# Altium PCB Thunderscope_Rev5.3.PcbDoc (part 10 of 14)
Units mil, origin at the board's own origin, x right, y up, seen from the top; angles counter-clockwise.
Board outline 3937.01 x 3838.58 mil, 6 copper layers (F.Cu, In1.Cu (GND), In2.Cu (Sign), In3.Cu (Sign), In4.Cu (GND), B.Cu), stack 60.556 mil thick; 911 components, 486 nets, 2834 pads, 2761 vias.
Unrouted connection lines stored in the file: 618.
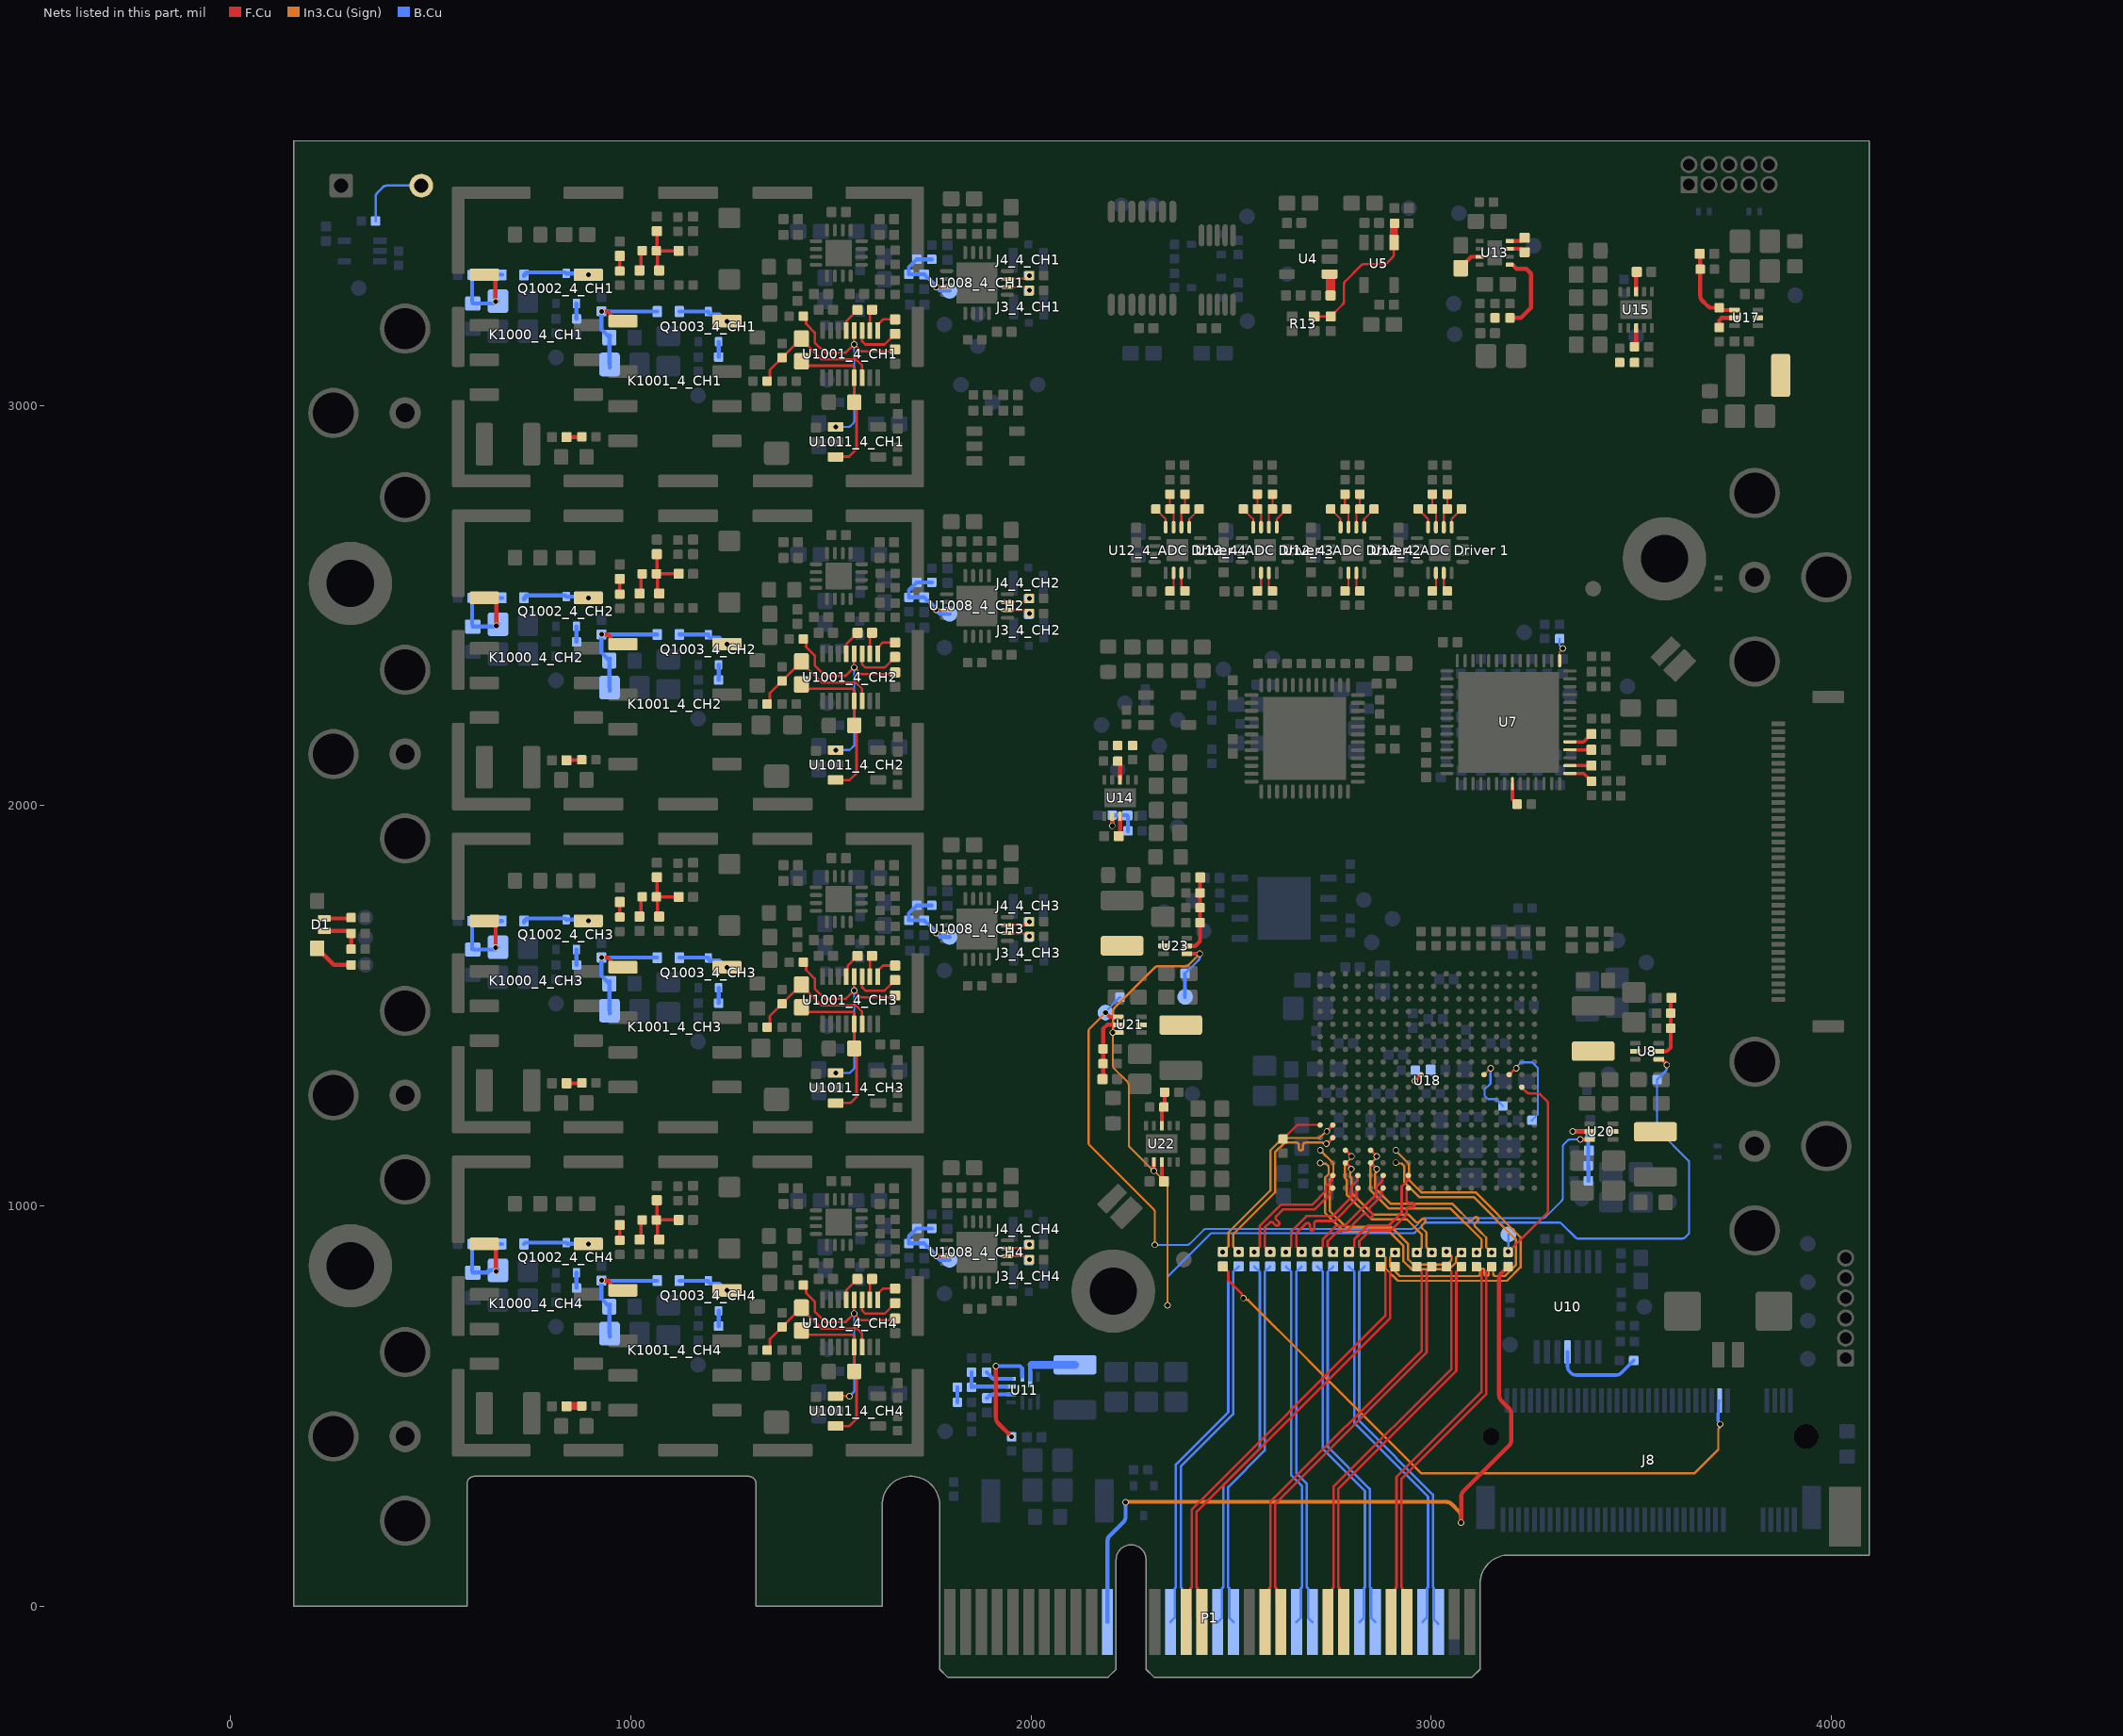
[diagram p13: the nets of this part, all layers, seen from the top]

## Via types
v1: diameter 16, hole 11.81, F.Cu to B.Cu, tented both sides, 2761 vias

## Nets (pads, with @x,y where several pads share a name; then routed paths per layer and width w, separated by ;. In a path a pad name is that pad's centre, name@x,y a point inside that pad or via, vN(x,y) a via of type N, cw(c..) or ccw(c..) an arc to the next point about the centre after c; other vN are vias at no path point) (continued)
M2_REFCLK_P: C47.1 J8.56 | length 1600.6
  F.Cu w6.2: C47.1@2479.33,849.02 2492.92,835.4 2492.92,814.4 2526.06,781.26 2526.06,777.69 2530.96,772.79 v1(2530.96,770.13)
  In3.Cu (Sign) w5.7: 2538.82,765.06 2542.61,765.06 2694.06,613.61 2694.06,612.99 2974.36,332.69 3658.02,332.69 3717.27,391.95 3717.27,442.9 3719.95,445.58 3719.95,452.75 v1(3721.92,454.72)
  B.Cu w7.51: 3716.89,462.05 3716.89,482.63 3718.23,483.98 3718.23,511.54 J8.56@3720.47,513.78
MGT_CLK1_N: C44.2 C46.2 U18.B5 | length 487.2
  F.Cu w7.51: v1@2739.43,1155.38 U18.B5@2753.99,1169.94
  In3.Cu (Sign) w5.7: v1(2518.7,885.24) 2504.87,899.07 2504.87,928.99 2609.85,1033.98 2609.85,1134.24 2633.8,1158.19 2650,1158.19 2663.55,1158.19 cw(c2663.55,1152.49) 2669.25,1152.49 2669.25,1144.34 ccw(c2674.6,1144.34) 2679.95,1144.34 2679.95,1152.49 cw(c2685.65,1152.49) 2685.65,1158.19 2710.47,1158.19 2728.15,1158.19 2728.99,1157.35 2736.27,1157.35 v1(2738.24,1155.38)
MGT_CLK1_P: C45.2 C47.2 U18.B6 | length 494.2
  F.Cu w7.51: v1(2739.43,1186.87) U18.B6@2753.99,1201.44
  In3.Cu (Sign) w5.7: v1(2479.33,885.24) 2493.17,899.07 2493.17,933.84 2598.15,1038.83 2598.15,1139.08 2628.96,1169.89 2720.51,1169.89 2737.5,1186.87 v1(2739.43,1186.87)
  B.Cu w7.51: v1(2479.33,885.24) C45.2@2486.05,891.95
MGT_RX0_N: R25.1 R27.1 U18.E3 | length 473.4
  F.Cu w7.51: U18.E3@2849.17,1107.64 2863.84,1092.97 v1(2863.84,1092.38)
  In3.Cu (Sign) w5.7: v1(2863.84,1092.38) 2861.86,1090.41 2861.86,1083.13 2859.29,1080.56 2859.29,1044.94 2898.97,1005.26 3053.14,1005.26 3073.17,985.23 3075.19,983.21 3093.99,964.41 ccw(c3098.02,968.44) 3102.05,964.41 3108.45,970.81 cw(c3112.23,967.02) 3116.02,970.81 cw(c3112.23,967.02) 3116.02,963.24 3109.62,956.84 ccw(c3113.65,952.81) 3109.62,948.78 3117.19,941.22 3119.2,939.2 3137.56,920.84 3137.56,896.88 v1(3150.59,883.86)
MGT_RX0_P: R26.1 R28.1 U18.E4 | length 479
  F.Cu w7.51: U18.E4@2849.17,1139.14 2863.74,1124.57 v1(2863.74,1123.88)
  In3.Cu (Sign) w5.7: v1(2863.74,1123.88) 2863.74,1121.09 2847.59,1104.95 2847.59,1040.09 2894.13,993.56 3048.3,993.56 3125.86,915.99 3125.86,896.88 v1(3112.84,883.86)
MGT_RX1_N: R29.1 R31.1 U18.A3 | length 590.3
  In3.Cu (Sign) w5.7: v1(2722.44,1107.78) 2724.41,1105.8 2736.77,1105.8 2743.66,1098.92 2743.66,1079.78 2734.75,1070.87 2734.75,982.79 2781.13,936.41 2894.15,936.41 2930.69,899.88 2930.69,861.99 2950.47,842.2 3045.08,842.2 3062.59,859.71 3062.59,872.03 3074.41,883.86 v1(3075.44,883.86)
MGT_RX1_P: R30.1 R32.1 U18.A4 | length 582.8
  F.Cu w7.51: U18.A4@2722.44,1139.27 v1(2722.83,1139.27)
  In3.Cu (Sign) w5.7: v1(2722.83,1139.27) 2755.36,1106.74 2755.36,1074.94 2746.45,1066.03 2746.45,987.64 2785.98,948.11 2899,948.11 2942.39,904.72 2942.39,866.84 2955.32,853.9 3040.23,853.9 3050.89,864.55 3050.89,874 3039.06,885.83 v1(3038.04,885.83)
MGT_RX2_N: R33.1 R35.1 U18.C3 | length 398.9
  F.Cu w7.51: U18.C3@2785.49,1108.33 v1@2800.35,1093.47
  In3.Cu (Sign) w5.7: v1(2800.06,1092.68) 2798.09,1090.71 2798.09,1083.43 2797.28,1082.62 2797.28,1073.18 2800.39,1070.07 2800.39,1033.67 2855.74,978.33 2943.51,978.33 2953.48,968.36 2955.5,966.34 2961.68,960.16 ccw(c2965.71,964.19) 2969.74,960.16 2976.65,967.06 cw(c2980.43,963.28) 2984.21,967.06 cw(c2980.43,963.28) 2984.21,959.5 2977.31,952.59 ccw(c2981.34,948.56) 2977.31,944.53 2988.13,933.7 2988.13,928.13 2988.13,896.71 v1(3000.98,883.86)
MGT_RX2_P: R34.1 R36.1 U18.C4 | length 404.5
  F.Cu w7.51: U18.C4@2786.18,1139.14 2800.74,1124.57 v1(2800.74,1123.88)
  In3.Cu (Sign) w5.7: v1(2800.74,1123.88) 2800.74,1121.09 2784.21,1104.55 2784.21,1069.71 2788.69,1065.23 2788.69,1028.83 2850.89,966.63 2938.66,966.63 2976.43,928.86 2976.43,896.71 v1(2963.58,883.86)
MGT_RX3_N: R37.1 R39.1 U18.G3 | length 905.4
  In3.Cu (Sign) w5.7: v1(2909.78,883.86) 2897.26,871.33 2897.26,849.05 2921.37,824.93 3054.82,824.93 3116.78,824.93 ccw(c3116.78,830.63) 3122.48,830.63 3122.48,838.06 cw(c3127.83,838.06) 3133.18,838.06 3133.18,830.28 ccw(c3138.53,830.28) 3143.88,830.28 3143.88,841.58 cw(c3149.23,841.58) 3154.58,841.58 3154.58,830.63 ccw(c3160.28,830.63) 3160.28,824.93 3173.84,824.93 3184.37,824.93 3211.45,852.01 3211.45,917.03 3106.06,1022.42 2970.04,1022.42 2932.98,1059.49 2932.98,1099.55 2926.3,1106.22 2913.26,1106.22 v1(2911.42,1108.07)
MGT_RX3_P: R38.1 R40.1 U18.G4 | length 911
  F.Cu w7.51: v1(2911.42,1139.27) 2911.55,1139.14 U18.G4@2912.16,1139.14
  In3.Cu (Sign) w5.7: v1(2873.03,883.86) 2885.56,871.33 2885.56,844.2 2916.53,813.23 3189.22,813.23 3223.15,847.16 3223.15,921.88 3110.9,1034.12 2974.89,1034.12 2944.68,1064.34 2944.68,1104.39 2911.42,1137.65 v1(2911.42,1139.27)
MGT_TX0_N: C28.2 C30.2 U18.H1 | length 276.5
  F.Cu w6.2: C30.2@2833.66,885.26 2820.08,898.85 2820.08,912.27 2846.84,939.03 2898.81,939.03 2929.78,970 2938.33,978.55 2938.33,990.5 cw(c2944.53,990.5) 2944.53,996.7 2952.77,996.7 ccw(c2952.77,1002.3) 2952.77,1007.9 2944.53,1007.9 cw(c2944.53,1014.1) 2938.33,1014.1 2938.33,1024.87 2938.33,1038.15 2942.91,1042.73 U18.H1@2942.91,1044.78
  other v1: 2833.66,885.24
MGT_TX0_P: C29.2 C31.2 U18.H2 | length 283.1
  F.Cu w6.2: C31.2@2794.29,885.26 2807.88,898.85 2807.88,917.32 2841.78,951.23 2893.76,951.23 2926.13,983.61 2926.13,1048.81 2941.46,1064.14 2941.46,1074.83 U18.H2@2942.91,1076.28
  other v1: 2794.29,885.24
MGT_TX1_N: C32.2 C34.2 U18.F1 | length 265.3
  F.Cu w6.2: C34.2@2754.92,885.26 2741.34,898.85 2741.34,912.27 2767.52,938.46 2789.26,938.46 2819.52,968.71 2829.63,978.83 cw(c2834.02,974.44) 2838.4,978.83 2844.23,973 ccw(c2848.19,976.96) 2852.15,973 ccw(c2848.19,976.96) 2852.15,980.92 2846.32,986.74 cw(c2850.7,991.13) 2846.32,995.51 2858.21,1007.4 2875.34,1024.53 2875.34,1038.15 2879.92,1042.73 U18.F1@2879.92,1044.78
  other v1: 2754.92,885.24
MGT_TX1_P: C33.2 C35.2 U18.F2 | length 271.9
  F.Cu w6.2: C35.2@2715.55,885.26 2729.14,898.85 2729.14,917.32 2762.47,950.66 2784.21,950.66 2863.14,1029.59 2863.14,1048.81 2878.47,1064.14 2878.47,1074.83 U18.F2@2879.92,1076.28
  other v1: 2715.55,885.24
MGT_TX2_N: C36.2 C38.2 U18.D1 | length 297.4
  F.Cu w6.2: C38.2@2676.18,885.26 2662.6,898.85 2662.6,932.07 2679.63,949.11 2686.14,955.62 cw(c2690.53,951.24) 2696.73,951.24 2696.73,944.4 ccw(c2702.33,944.4) 2707.93,944.4 2707.93,956.47 cw(c2714.13,956.47) 2714.13,962.67 2735.08,962.67 2758.7,962.67 2812.35,1016.31 2812.35,1038.15 2816.93,1042.73 U18.D1@2816.93,1044.78
  other v1: 2676.18,885.24
MGT_TX2_P: C37.2 C39.2 U18.D2 | length 304
  F.Cu w6.2: C39.2@2636.81,885.26 2650.4,898.85 2650.4,937.13 2688.14,974.87 2753.65,974.87 2800.15,1021.37 2800.15,1048.81 2815.48,1064.14 2815.48,1074.83 U18.D2@2816.93,1076.28
  other v1: 2636.81,885.24
MGT_TX3_N: C40.2 C42.2 U18.B1 | length 311.8
  F.Cu w6.2: C42.2@2597.44,885.26 2583.86,898.85 2583.86,945.92 2586.1,948.16 2596.21,958.27 cw(c2600.59,953.88) 2604.98,958.27 2610.8,952.44 ccw(c2614.76,956.4) 2618.72,952.44 ccw(c2614.76,956.4) 2618.72,960.36 2612.9,966.19 cw(c2617.28,970.57) 2612.9,974.96 2621.91,983.97 2629.41,991.47 2708.34,991.47 2749.36,1032.49 2749.36,1038.15 2753.94,1042.73 U18.B1@2753.94,1044.78
  other v1: 2597.44,885.24
MGT_TX3_P: C41.2 C43.2 U18.B2 | length 318.4
  F.Cu w6.2: C43.2@2558.07,885.26 2571.66,898.85 2571.66,950.97 2624.36,1003.67 2703.29,1003.67 2737.16,1037.54 2737.16,1048.81 2752.49,1064.14 2752.49,1074.83 U18.B2@2753.94,1076.28
  other v1: 2558.07,885.24
NetC4_2: C4.2 R13.4 R107.2 U5.1 | length 371.6
  F.Cu w6: R13.4@2707.48,3222.64 2739.37,3222.64 C4.2@2748.82,3222.24 2778.4,3251.82 ccw(c2769.89,3260.29) 2781.89,3260.29 2781.89,3302.12 cw(c2793.89,3302.12) 2785.4,3310.6 2824.07,3349.27 cw(c2832.53,3340.76) 2832.53,3352.76 2880.86,3352.76 ccw(c2880.86,3364.76) 2889.34,3356.27 2903.26,3370.19 ccw(c2894.79,3378.69) 2906.79,3378.69 U5.1@2906.79,3407.09
  F.Cu w19.68: U5.1@2906.79,3407.09 2906.79,3452.95 R107.2@2908.37,3454.92
NetC7_1: C7.1 U4.1 | length 54.1
  F.Cu w10: U4.1@2746.06,3328.15 U4.1@2748.42,3325.79
  F.Cu w23.62: C7.1@2748.42,3275 U4.1@2748.42,3325.79
NetC13_2: C13.2 U11.8 | length 64.5
  B.Cu w10: C13.2@1889.76,520.08 1897.36,527.68 1901.74,527.68 1903.22,529.16 U11.8@1950.55,529.16
NetC64_2: C64.2 U7.15 | length 62.3
  F.Cu w8: U7.15@3346.46,2080.71 3380.91,2080.71 C64.2@3400.59,2061.02
NetC65_2: C65.2 U7.16 | length 54.1
  F.Cu w8: U7.16@3346.46,2100.39 C65.2@3400.59,2100.39
NetC66_1: C66.1 U7.18 | length 53.7
  F.Cu w8: U7.18@3346.46,2139.76 C66.1@3400.2,2139.76
NetC67_1: C67.1 U7.19 | length 61.9
  F.Cu w8: U7.19@3346.46,2159.45 3380.51,2159.45 C67.1@3400.2,2179.13
NetC74_1: C74.1 R55.2 R56.2 U8.5 | length 158.6
  F.Cu w10: U8.5@3568.5,1386.27 3588.58,1386.27 3598.43,1396.11 R56.2@3598.43,1444.34 R55.2@3598.43,1481.74 3598.43,1518.75 C74.1@3599.8,1520.13
NetC77_2: C77.2 R86.1 R101.2 U14.7 | length 128.5
  F.Cu w10: v1(2202.76,1949.8) U14.7@2202.76,1974.41
  B.Cu w10: v1(2202.76,1949.8) R101.2@2202.76,1976.38 2239.76,1976.38 C77.2@2240.75,1975.39 2242.13,1974.02 R86.1@2242.13,1937.01
NetC100_1: C100.1 R109.1 R110.1 U17.1 | length 208.8
  F.Cu w10: C100.1@3667.13,3378.94 3672.05,3371.34 3672.05,3275.21 ccw(c3692.05,3275.21) 3677.84,3261.14 3689.06,3249.92 ccw(c3703.17,3264.09) 3703.17,3244.09 R110.1@3719.49,3244.1 3726.3,3238.58 U17.1@3757.68,3238.58
NetC112_1: C112.1 U13.8 | length 40.6
  F.Cu w10: U13.8@3196.06,3410.83 3225,3410.83 C112.1@3233.27,3419.09
NetC112_2: C112.2 U13.7 | length 40.6
  F.Cu w10: U13.7@3196.06,3391.14 3225,3391.14 C112.2@3233.27,3382.87
NetC114_2: C114.2 U13.3 | length 60.8
  F.Cu w10: C114.2@3073.82,3342.91 3073.82,3345.53 3099.75,3371.46 U13.3@3121.26,3371.46
NetC123_2: C123.2 U14.8 | length 53.5
  F.Cu w10: C123.2@2222.44,1920.87 U14.8@2222.44,1974.41
NetC124_2: C124.2 U15.8 | length 49.9
  F.Cu w10: U15.8@3512.01,3284.45 3512.01,3332.09 C124.2@3513.58,3333.66
NetC167_1: C167.1 FB12.2 U18.J10 | length 22.3
  F.Cu w10: v1(2958.85,1312.46) U18.J10@2974.6,1328.25
NetC174_1: C174.1 R69.1 R118.1 R119.1 U20.5 | length 209.1
  F.Cu w10: v1(3353.35,1186.02) U20.5@3396.06,1186.02
  B.Cu w10: v1(3353.35,1186.02) 3391.73,1186.02 R119.1@3397.64,1180.12 3392.13,1174.61 3392.13,1100.98 R118.1@3392.72,1100.39 R69.1@3392.72,1062.99
NetC178_1: C178.1 R122.1 R124.2 U21.5 | length 168.3
  F.Cu w10: C178.1@2178.74,1316.93 2180.12,1318.31 R122.1@2180.12,1355.31 R124.2@2180.12,1392.72 2180.12,1442.72 2190.16,1452.76 U21.5@2217.91,1452.76
NetC185_2: C185.2 U22.8 | length 48.8
  F.Cu w10: C185.2@2326.77,1061.42 U22.8@2326.77,1110.24
NetC186_1: C186.1 R70.2 R129.1 R130.1 U23.5 | length 197.5
  F.Cu w10: U23.5@2389.37,1649.61 2410.63,1649.61 2422.24,1661.22 R130.1@2422.24,1707.68 R70.2@2422.24,1745.08 R129.1@2422.24,1782.48 2422.24,1820.47 C186.1@2422.64,1820.87
NetC1001_4_CH1_1: C1001_4_CH1.1 U1001_4_CH1.5 | length 63.8
  F.Cu w6: U1001_4_CH1.5@1538.39,3187.01 1538.39,3210.58 1566.54,3238.73 C1001_4_CH1.1@1566.54,3239.17
NetC1001_4_CH1_2: C1001_4_CH1.2 U1001_4_CH1.2 | length 54.4
  F.Cu w6: U1001_4_CH1.2@1597.44,3187.01 1597.44,3233.86 C1001_4_CH1.2@1602.76,3239.17
NetC1001_4_CH2_1: C1001_4_CH2.1 U1001_4_CH2.5 | length 63.8
  F.Cu w6: U1001_4_CH2.5@1538.39,2379.92 1538.39,2403.5 1566.54,2431.65 C1001_4_CH2.1@1566.54,2432.09
NetC1001_4_CH2_2: C1001_4_CH2.2 U1001_4_CH2.2 | length 54.4
  F.Cu w6: U1001_4_CH2.2@1597.44,2379.92 1597.44,2426.77 C1001_4_CH2.2@1602.76,2432.09
NetC1001_4_CH3_1: C1001_4_CH3.1 U1001_4_CH3.5 | length 62.3
  F.Cu w6: U1001_4_CH3.5@1538.39,1572.83 1541.29,1590.5 1541.29,1594.7 cw(c1553.29,1594.7) 1544.79,1603.17 1557.12,1615.55 C1001_4_CH3.1@1566.54,1625
NetC1001_4_CH3_2: C1001_4_CH3.2 U1001_4_CH3.2 | length 54.4
  F.Cu w6: U1001_4_CH3.2@1597.44,1572.83 1597.44,1619.69 C1001_4_CH3.2@1602.76,1625
NetC1001_4_CH4_1: C1001_4_CH4.1 U1001_4_CH4.5 | length 63.8
  F.Cu w6: U1001_4_CH4.5@1538.39,765.75 1538.39,789.32 1566.54,817.47 C1001_4_CH4.1@1566.54,817.91
NetC1001_4_CH4_2: C1001_4_CH4.2 U1001_4_CH4.2 | length 54.4
  F.Cu w6: U1001_4_CH4.2@1597.44,765.75 1597.44,812.6 C1001_4_CH4.2@1602.76,817.91
NetC1002_4_CH1_1: C1002_4_CH1.1 U1001_4_CH1.3 | length 130.4
  F.Cu w6: U1001_4_CH1.3@1577.76,3187.01 1577.76,3160.43 1585.83,3152.36 1634.06,3152.36 C1002_4_CH1.1@1660.43,3178.74 C1002_4_CH1.1@1667.32,3178.74
NetC1002_4_CH1_2: C1002_4_CH1.2 U1001_4_CH1.1 | length 63.5
  F.Cu w6: U1001_4_CH1.1@1617.13,3187.01 1617.13,3201.77 1630.31,3214.96 C1002_4_CH1.2@1660.43,3214.96
NetC1002_4_CH2_1: C1002_4_CH2.1 U1001_4_CH2.3 | length 130.4
  F.Cu w6: U1001_4_CH2.3@1577.76,2379.92 1577.76,2353.35 1585.83,2345.28 1634.06,2345.28 C1002_4_CH2.1@1660.43,2371.65 C1002_4_CH2.1@1667.32,2371.65
NetC1002_4_CH2_2: C1002_4_CH2.2 U1001_4_CH2.1 | length 63.5
  F.Cu w6: U1001_4_CH2.1@1617.13,2379.92 1617.13,2394.69 1630.31,2407.87 C1002_4_CH2.2@1660.43,2407.87
NetC1002_4_CH3_1: C1002_4_CH3.1 U1001_4_CH3.3 | length 130.4
  F.Cu w6: U1001_4_CH3.3@1577.76,1572.83 1577.76,1546.26 1585.83,1538.19 1634.06,1538.19 C1002_4_CH3.1@1660.43,1564.57 C1002_4_CH3.1@1667.32,1564.57
NetC1002_4_CH3_2: C1002_4_CH3.2 U1001_4_CH3.1 | length 63.5
  F.Cu w6: U1001_4_CH3.1@1617.13,1572.83 1617.13,1587.6 1630.31,1600.79 C1002_4_CH3.2@1660.43,1600.79
NetC1002_4_CH4_1: C1002_4_CH4.1 U1001_4_CH4.3 | length 130.4
  F.Cu w6: U1001_4_CH4.3@1577.76,765.75 1577.76,739.17 1585.83,731.1 1634.06,731.1 C1002_4_CH4.1@1660.43,757.48 C1002_4_CH4.1@1667.32,757.48
NetC1002_4_CH4_2: C1002_4_CH4.2 U1001_4_CH4.1 | length 63.5
  F.Cu w6: U1001_4_CH4.1@1617.13,765.75 1617.13,780.51 1630.31,793.7 C1002_4_CH4.2@1660.43,793.7
NetC1009_4_CH1_1: C1009_4_CH1.1 C1027_4_CH1.2 D1000_4_CH1.1 K1000_4_CH1.1 R1027_4_CH1.2 | length 295.5
  F.Cu w10: K1000_4_CH1.1@633.42,3329 648.56,3329 661.77,3315.79 661.77,3260.23 v1(662,3260)
  B.Cu w10: R1027_4_CH1.2@603.64,3260.63 C1009_4_CH1.1@603.64,3326.38 D1000_4_CH1.1@677.95,3326.38 ; R1027_4_CH1.2@605.12,3254.72 656.09,3254.72 C1027_4_CH1.2@662,3260.63 ; v1(662,3260) 667.48,3260 C1027_4_CH1.2@668.11,3260.63
NetC1009_4_CH2_1: C1009_4_CH2.1 C1027_4_CH2.2 D1000_4_CH2.1 K1000_4_CH2.1 R1027_4_CH2.2 | length 305.8
  F.Cu w10: K1000_4_CH2.1@630.38,2523 649.7,2523 664,2508.7 v1(664,2450)
  B.Cu w10: R1027_4_CH2.2@603.64,2453.54 C1009_4_CH2.1@603.64,2519.29 D1000_4_CH2.1@677.95,2519.29 ; R1027_4_CH2.2@605.12,2447.64 658.66,2447.64 C1027_4_CH2.2@664.57,2453.54 ; v1(664,2450) 664.57,2450 C1027_4_CH2.2@668.11,2453.54
NetC1009_4_CH3_1: C1009_4_CH3.1 C1027_4_CH3.2 D1000_4_CH3.1 K1000_4_CH3.1 R1027_4_CH3.2 | length 305.8
  F.Cu w10: K1000_4_CH3.1@633.86,1712.36 651.25,1712.36 662,1701.61 v1(662,1646)
  B.Cu w10: v1(662,1646) 662,1640.76 C1027_4_CH3.2@662.2,1640.55 ; C1027_4_CH3.2@668.11,1646.46 662,1646.46 656.09,1640.55 R1027_4_CH3.2@605.12,1640.55 603.64,1642.03 C1009_4_CH3.1@603.64,1712.2 D1000_4_CH3.1@677.95,1712.2
NetC1009_4_CH4_1: C1009_4_CH4.1 C1027_4_CH4.2 D1000_4_CH4.1 K1000_4_CH4.1 R1027_4_CH4.2 | length 326.4
  F.Cu w10: K1000_4_CH4.1@629.26,905.27 652.25,905.27 663,894.52 v1(663,837)
  B.Cu w10: R1027_4_CH4.2@604.64,837 603.64,838 C1009_4_CH4.1@603.64,905.12 D1000_4_CH4.1@677.95,905.12 ; R1027_4_CH4.2@605.12,833.46 642.54,833.46 648.44,839.37 663,839.37 662.58,838.95 644.47,838.95 642.52,837 ; v1(663,837) 665.74,837 C1027_4_CH4.2@668.11,839.37
NetC1010_4_CH1_1: C1010_4_CH1.1 C1029_4_CH1.2 D1001_4_CH1.1 K1001_4_CH1.1 R1028_4_CH1.2 | length 366.1
  F.Cu w10: v1(926.77,3235.04) 942.84,3235.04 948.7,3229.18 948.7,3221.38 959.45,3210.63 K1001_4_CH1.1@994.29,3210.63
  B.Cu w10: R1028_4_CH1.2@946.46,3174.02 R1028_4_CH1.2@947.83,3175.39 ; C1029_4_CH1.2@946.85,3094.88 C1029_4_CH1.2@947.83,3095.87 ; C1029_4_CH1.2@946.85,3102.36 946.46,3102.76 R1028_4_CH1.2@946.46,3169.69 926.77,3189.37 v1(926.77,3235.04) 926.97,3234.84 1059.33,3234.84 1059.53,3234.65 D1001_4_CH1.1@1066.14,3234.65
NetC1010_4_CH2_1: C1010_4_CH2.1 C1029_4_CH2.2 D1001_4_CH2.1 K1001_4_CH2.1 R1028_4_CH2.2 | length 366.1
  F.Cu w10: v1(926.77,2427.95) 942.84,2427.95 948.7,2422.09 948.7,2414.29 959.45,2403.54 K1001_4_CH2.1@994.29,2403.54
  B.Cu w10: R1028_4_CH2.2@946.46,2366.93 R1028_4_CH2.2@947.83,2368.31 ; C1029_4_CH2.2@946.85,2287.8 C1029_4_CH2.2@947.83,2288.78 ; C1029_4_CH2.2@946.85,2295.28 946.46,2295.67 R1028_4_CH2.2@946.46,2362.6 926.77,2382.28 v1(926.77,2427.95) 927.17,2427.56 D1001_4_CH2.1@1066.14,2427.56
NetC1010_4_CH3_1: C1010_4_CH3.1 C1029_4_CH3.2 D1001_4_CH3.1 K1001_4_CH3.1 R1028_4_CH3.2 | length 366.1
  F.Cu w10: v1(926.77,1620.87) 942.84,1620.87 948.7,1615.01 948.7,1607.2 959.45,1596.46 K1001_4_CH3.1@994.29,1596.46
  B.Cu w10: R1028_4_CH3.2@946.46,1559.84 R1028_4_CH3.2@947.83,1561.22 ; C1029_4_CH3.2@946.85,1480.71 C1029_4_CH3.2@947.83,1481.69 ; C1029_4_CH3.2@946.85,1488.19 946.46,1488.58 R1028_4_CH3.2@946.46,1555.51 926.77,1575.2 v1(926.77,1620.87) 926.97,1620.67 1059.33,1620.67 1059.53,1620.47 D1001_4_CH3.1@1066.14,1620.47
NetC1010_4_CH4_1: C1010_4_CH4.1 C1029_4_CH4.2 D1001_4_CH4.1 K1001_4_CH4.1 R1028_4_CH4.2 | length 366.1
  F.Cu w10: v1(926.77,813.78) 942.84,813.78 948.7,807.92 948.7,800.12 959.45,789.37 K1001_4_CH4.1@994.29,789.37
  B.Cu w10: R1028_4_CH4.2@946.46,752.76 R1028_4_CH4.2@947.83,754.13 ; C1029_4_CH4.2@946.85,673.62 C1029_4_CH4.2@947.83,674.61 ; C1029_4_CH4.2@946.85,681.1 946.46,681.5 R1028_4_CH4.2@946.46,748.43 926.77,768.11 v1(926.77,813.78) 927.17,813.39 D1001_4_CH4.1@1066.14,813.39
NetC1011_4_CH1_2: C1011_4_CH1.2 R1001_4_CH1.1 | length 38
  F.Cu w8.39: R1001_4_CH1.1@972.44,3335.63 C1011_4_CH1.2@972.44,3373.62
NetC1011_4_CH2_2: C1011_4_CH2.2 R1001_4_CH2.1 | length 38
  F.Cu w8.39: R1001_4_CH2.1@972.44,2528.54 C1011_4_CH2.2@972.44,2566.54
NetC1011_4_CH3_2: C1011_4_CH3.2 R1001_4_CH3.1 | length 38
  F.Cu w8.39: R1001_4_CH3.1@972.44,1721.46 C1011_4_CH3.2@972.44,1759.45
NetC1011_4_CH4_2: C1011_4_CH4.2 R1001_4_CH4.1 | length 38
  F.Cu w8.39: R1001_4_CH4.1@972.44,914.37 C1011_4_CH4.2@972.44,952.36
NetC1012_4_CH1_1: C1012_4_CH1.1 R1002_4_CH1.1 | length 51.9
  F.Cu w8.39: C1012_4_CH1.1@1021.65,3337.4 1025.2,3340.94 1025.2,3383.07 R1002_4_CH1.1@1028.54,3386.42
NetC1012_4_CH2_1: C1012_4_CH2.1 R1002_4_CH2.1 | length 51.9
  F.Cu w8.39: C1012_4_CH2.1@1021.65,2530.32 1025.2,2533.86 1025.2,2575.98 R1002_4_CH2.1@1028.54,2579.33
NetC1012_4_CH3_1: C1012_4_CH3.1 R1002_4_CH3.1 | length 51.9
  F.Cu w8.39: C1012_4_CH3.1@1021.65,1723.23 1025.2,1726.77 1025.2,1768.9 R1002_4_CH3.1@1028.54,1772.24
NetC1012_4_CH4_1: C1012_4_CH4.1 R1002_4_CH4.1 | length 51.9
  F.Cu w8.39: C1012_4_CH4.1@1021.65,916.14 1025.2,919.69 1025.2,961.81 R1002_4_CH4.1@1028.54,965.16
NetC1023_4_CH1_1: C1023_4_CH1.1 C1024_4_CH1.2 C1025_4_CH1.2 R1002_4_CH1.2 | length 156.8
  F.Cu w8.39: C1025_4_CH1.2@1064.96,3435.63 1064.96,3387.4 R1002_4_CH1.2@1063.98,3386.42 ; C1023_4_CH1.1@1070.87,3337.4 1066.93,3341.34 1066.93,3383.47 R1002_4_CH1.2@1063.98,3386.42 ; C1024_4_CH1.2@1119.29,3386.42 R1002_4_CH1.2@1063.98,3386.42
NetC1023_4_CH2_1: C1023_4_CH2.1 C1024_4_CH2.2 C1025_4_CH2.2 R1002_4_CH2.2 | length 156.8
  F.Cu w8.39: C1025_4_CH2.2@1064.96,2628.54 1064.96,2580.31 R1002_4_CH2.2@1063.98,2579.33 ; C1023_4_CH2.1@1070.87,2530.32 1066.93,2534.25 1066.93,2576.38 R1002_4_CH2.2@1063.98,2579.33 ; C1024_4_CH2.2@1119.29,2579.33 R1002_4_CH2.2@1063.98,2579.33
NetC1023_4_CH3_1: C1023_4_CH3.1 C1024_4_CH3.2 C1025_4_CH3.2 R1002_4_CH3.2 | length 156.8
  F.Cu w8.39: C1025_4_CH3.2@1064.96,1821.46 1064.96,1773.23 R1002_4_CH3.2@1063.98,1772.24 ; C1023_4_CH3.1@1070.87,1723.23 1066.93,1727.17 1066.93,1769.29 R1002_4_CH3.2@1063.98,1772.24 ; C1024_4_CH3.2@1119.29,1772.24 R1002_4_CH3.2@1063.98,1772.24
NetC1023_4_CH4_1: C1023_4_CH4.1 C1024_4_CH4.2 C1025_4_CH4.2 R1002_4_CH4.2 | length 156.8
  F.Cu w8.39: C1025_4_CH4.2@1064.96,1014.37 1064.96,966.14 R1002_4_CH4.2@1063.98,965.16 ; C1023_4_CH4.1@1070.87,916.14 1066.93,920.08 1066.93,962.21 R1002_4_CH4.2@1063.98,965.16 ; C1024_4_CH4.2@1119.29,965.16 R1002_4_CH4.2@1063.98,965.16
NetC1031_4_CH1_1: C1031_4_CH1.1 R1039_4_CH1.2 R1047_4_CH1.1 U1001_4_CH1.14 | length 358.4
  F.Cu w6: R1039_4_CH1.2@1340.55,3061.02 1347.44,3067.91 1347.44,3088.58 C1031_4_CH1.1@1426.18,3167.32 1426.18,3165.35 1476.38,3115.16 1562.61,3115.16 1577.76,3100.01 U1001_4_CH1.14@1577.76,3068.9
  F.Cu w10: R1047_4_CH1.1@1377.95,3124.02 R1047_4_CH1.1@1382.87,3124.02
NetC1031_4_CH1_2: C1031_4_CH1.2 R1003_4_CH1.1 U1001_4_CH1.13 U1011_4_CH1.3 | length 392.9
  F.Cu w6: C1031_4_CH1.2@1426.18,3110.24 1437.01,3099.41 1553.88,3099.41 1558.07,3095.22 R1003_4_CH1.1@1558.07,3007.87 ; U1011_4_CH1.3@1511.81,2871.56 1512.41,2872.16 1545.47,2872.16 1563.98,2890.67 R1003_4_CH1.1@1563.98,2998.03
NetC1031_4_CH2_1: C1031_4_CH2.1 R1039_4_CH2.2 R1047_4_CH2.1 U1001_4_CH2.14 | length 358.1
  F.Cu w6: R1039_4_CH2.2@1340.55,2253.94 1347.44,2260.83 1347.44,2281.5 C1031_4_CH2.1@1426.18,2360.24 1426.18,2358.27 1476.38,2308.07 1562.12,2308.07 1577.76,2292.43 U1001_4_CH2.14@1577.76,2261.81
  F.Cu w10: R1047_4_CH2.1@1377.95,2316.93 R1047_4_CH2.1@1382.87,2316.93
NetC1031_4_CH2_2: C1031_4_CH2.2 R1003_4_CH2.1 U1001_4_CH2.13 U1011_4_CH2.3 | length 393.6
  F.Cu w6: C1031_4_CH2.2@1426.18,2303.15 1437.01,2292.32 1553.01,2292.32 1557.58,2287.76 1557.58,2262.3 U1001_4_CH2.13@1558.07,2261.81 R1003_4_CH2.1@1558.07,2200.79 ; U1011_4_CH2.3@1511.81,2064.47 1546.9,2064.47 1563.98,2081.55 R1003_4_CH2.1@1563.98,2190.95
NetC1031_4_CH3_1: C1031_4_CH3.1 R1039_4_CH3.2 R1047_4_CH3.1 U1001_4_CH3.14 | length 358.3
  F.Cu w6: R1039_4_CH3.2@1340.55,1446.85 1347.44,1453.74 1347.44,1474.41 C1031_4_CH3.1@1426.18,1553.15 1426.18,1551.18 1476.38,1500.98 1562.38,1500.98 1577.76,1485.61 U1001_4_CH3.14@1577.76,1454.72
  F.Cu w10: R1047_4_CH3.1@1377.95,1509.84 R1047_4_CH3.1@1382.87,1509.84
NetC1031_4_CH3_2: C1031_4_CH3.2 R1003_4_CH3.1 U1001_4_CH3.13 U1011_4_CH3.3 | length 395
  F.Cu w6: C1031_4_CH3.2@1426.18,1496.06 1437.01,1485.24 1553.4,1485.24 1557.77,1480.87 1557.77,1455.02 U1001_4_CH3.13@1558.07,1454.72 R1003_4_CH3.1@1558.07,1393.7 ; U1011_4_CH3.3@1511.81,1257.38 1548.86,1257.38 1563.98,1272.49 R1003_4_CH3.1@1563.98,1383.86
NetC1031_4_CH4_1: C1031_4_CH4.1 R1039_4_CH4.2 R1047_4_CH4.1 U1001_4_CH4.14 | length 359.8
  F.Cu w6: R1039_4_CH4.2@1340.55,639.76 1347.44,646.65 1347.44,667.32 C1031_4_CH4.1@1426.18,746.06 1426.18,744.09 1476.38,693.9 1564.93,693.9 1577.76,681.07 U1001_4_CH4.14@1577.76,647.64
  F.Cu w10: R1047_4_CH4.1@1377.95,702.76 R1047_4_CH4.1@1382.87,702.76
NetC1031_4_CH4_2: C1031_4_CH4.2 R1003_4_CH4.1 U1001_4_CH4.13 U1011_4_CH4.3 | length 393.7
  F.Cu w6: C1031_4_CH4.2@1426.18,688.98 1437.01,678.15 1553.9,678.15 1558.07,673.98 R1003_4_CH4.1@1558.07,586.61 ; U1011_4_CH4.3@1511.81,450.3 1546.26,450.3 1563.98,468.01 R1003_4_CH4.1@1563.98,576.77
NetC1058_4_CH1_1: C1058_4_CH1.1 R1053_4_CH1.1 | length 38.4
  F.Cu w10: C1058_4_CH1.1@839.28,2920.77 839.77,2921.26 876.78,2921.26 R1053_4_CH1.1@877.27,2921.75
NetC1058_4_CH2_1: C1058_4_CH2.1 R1053_4_CH2.1 | length 38.4
  F.Cu w10: C1058_4_CH2.1@839.28,2113.68 839.77,2114.17 876.78,2114.17 R1053_4_CH2.1@877.27,2114.67
NetC1058_4_CH3_1: C1058_4_CH3.1 R1053_4_CH3.1 | length 36.1
  F.Cu w8.39: C1058_4_CH3.1@839.15,1306.47 R1053_4_CH3.1@875.25,1306.47
NetC1058_4_CH4_1: C1058_4_CH4.1 R1053_4_CH4.1 | length 38.4
  F.Cu w8.39: C1058_4_CH4.1@839.28,499.51 C1058_4_CH4.1@840.26,500.49
  F.Cu w20: C1058_4_CH4.1@840.26,500.49 R1053_4_CH4.1@877.27,500.49
NetD1_1: D1.1 R64.2 | length 101.8
  F.Cu w10: D1.1@216.49,1643.7 257.83,1602.36 R64.2@301.18,1602.36
NetD1_3: D1.3 R6.2 | length 67.8
  F.Cu w10: D1.3@234.21,1718.5 299.21,1718.5 R6.2@301.18,1720.47
NetD1_4: D1.4 R65.1 R85.1 | length 108.8
  F.Cu w10: D1.4@234.21,1687.01 295.28,1687.01 R65.1@301.18,1681.1 R85.1@301.18,1641.73
NetD1000_4_CH1_2: D1000_4_CH1.2 K1000_4_CH1.8 Q1002_4_CH1.1 | length 175.6
  B.Cu w10: D1000_4_CH1.2@733.07,3322.83 D1000_4_CH1.2@739.96,3329.72 ; D1000_4_CH1.2@733.07,3326.38 739.47,3332.78 835.53,3332.78 Q1002_4_CH1.1@838.58,3329.72 888.89,3329.72 892.08,3326.54 v1(893.7,3326.54)
NetD1000_4_CH2_2: D1000_4_CH2.2 K1000_4_CH2.8 Q1002_4_CH2.1 | length 175.7
  B.Cu w10: D1000_4_CH2.2@733.07,2515.75 D1000_4_CH2.2@739.96,2522.64 ; D1000_4_CH2.2@733.07,2519.29 739.47,2525.69 835.53,2525.69 Q1002_4_CH2.1@838.58,2522.64 888.89,2522.64 892.08,2519.45 v1(893.7,2519.45)
NetD1000_4_CH3_2: D1000_4_CH3.2 K1000_4_CH3.8 Q1002_4_CH3.1 | length 175.6
  B.Cu w10: D1000_4_CH3.2@733.07,1708.66 D1000_4_CH3.2@739.96,1715.55 ; D1000_4_CH3.2@733.07,1712.2 739.47,1718.6 835.53,1718.6 Q1002_4_CH3.1@838.58,1715.55 888.89,1715.55 892.08,1712.36 v1(893.7,1712.36)
NetD1000_4_CH4_2: D1000_4_CH4.2 K1000_4_CH4.8 Q1002_4_CH4.1 | length 163.3
  B.Cu w10: D1000_4_CH4.2@733.07,905.12 736.42,908.47 Q1002_4_CH4.1@838.58,908.47 841.78,905.27 v1(893.7,905.27)
NetD1001_4_CH1_2: D1001_4_CH1.2 K1001_4_CH1.8 Q1003_4_CH1.1 | length 130.3
  B.Cu w10: D1001_4_CH1.2@1121.26,3234.65 1193.5,3234.65 Q1003_4_CH1.1@1193.9,3234.25 1193.9,3231.69 1198.15,3227.44 1221.72,3227.44 1238.53,3210.63 v1(1240.16,3210.63)
NetD1001_4_CH2_2: D1001_4_CH2.2 K1001_4_CH2.8 Q1003_4_CH2.1 | length 130.3
  B.Cu w10: D1001_4_CH2.2@1121.26,2427.56 1193.5,2427.56 Q1003_4_CH2.1@1193.9,2427.17 1193.9,2424.61 1198.15,2420.35 1221.72,2420.35 1238.53,2403.54 v1(1240.16,2403.54)
NetD1001_4_CH3_2: D1001_4_CH3.2 K1001_4_CH3.8 Q1003_4_CH3.1 | length 143.3
  F.Cu w10: v1(1240.16,1596.46) K1001_4_CH3.8@1253.15,1596.46
  B.Cu w10: D1001_4_CH3.2@1121.26,1620.47 1193.5,1620.47 Q1003_4_CH3.1@1193.9,1620.08 1193.9,1617.52 1198.15,1613.27 1221.72,1613.27 1238.53,1596.46 v1(1240.16,1596.46)
NetD1001_4_CH4_2: D1001_4_CH4.2 K1001_4_CH4.8 Q1003_4_CH4.1 | length 143.3
  F.Cu w10: v1(1240.16,789.37) K1001_4_CH4.8@1253.15,789.37
  B.Cu w10: D1001_4_CH4.2@1121.26,813.39 1193.5,813.39 Q1003_4_CH4.1@1193.9,812.99 1193.9,810.43 1198.15,806.18 1221.72,806.18 1238.53,789.37 v1(1240.16,789.37)
NetJ4_2: J4.2 R7.1 | length 188.9
  B.Cu w6: R7.1@362.2,3460.63 362.2,3522.1 cw(c374.2,3522.1) 365.7,3530.57 380.86,3545.73 cw(c389.31,3537.21) 389.31,3549.21 J4.2@476.55,3549.21
NetL1_2: L1.2 U17.5
NetL2_1: L2.1 U20.2
NetL3_1: L3.1 U21.2
NetL4_1: L4.1 U23.2
NetL5_1: L5.1 U8.2
NetL6_1: L6.1 U11.2 | length 147.4
  B.Cu w10: U11.2@1997.76,566.56 1997.76,600.42 2000.83,603.5
  B.Cu w20: 2000.83,603.5 L6.1@2110,603.5
NetQ1002_4_CH1_2: Q1002_4_CH1.2 R1029_4_CH1.1 | length 38.4
  B.Cu w10: R1029_4_CH1.1@864.17,3216.54 Q1002_4_CH1.2@864.17,3254.92
NetQ1002_4_CH2_2: Q1002_4_CH2.2 R1029_4_CH2.1 | length 38.4
  B.Cu w10: R1029_4_CH2.1@864.17,2409.45 Q1002_4_CH2.2@864.17,2447.83
NetQ1002_4_CH3_2: Q1002_4_CH3.2 R1029_4_CH3.1 | length 38.4
  B.Cu w10: R1029_4_CH3.1@864.17,1602.36 Q1002_4_CH3.2@864.17,1640.75
NetQ1002_4_CH4_2: Q1002_4_CH4.2 R1029_4_CH4.1 | length 38.4
  B.Cu w10: R1029_4_CH4.1@864.17,795.28 Q1002_4_CH4.2@864.17,833.66
NetQ1003_4_CH1_2: Q1003_4_CH1.2 R1030_4_CH1.1 | length 38.4
  B.Cu w10: R1030_4_CH1.1@1219.49,3121.06 Q1003_4_CH1.2@1219.49,3159.45
NetQ1003_4_CH2_2: Q1003_4_CH2.2 R1030_4_CH2.1 | length 38.4
  B.Cu w10: R1030_4_CH2.1@1219.49,2313.98 Q1003_4_CH2.2@1219.49,2352.36
NetQ1003_4_CH3_2: Q1003_4_CH3.2 R1030_4_CH3.1 | length 38.4
  B.Cu w10: R1030_4_CH3.1@1219.49,1506.89 Q1003_4_CH3.2@1219.49,1545.28
NetQ1003_4_CH4_2: Q1003_4_CH4.2 R1030_4_CH4.1 | length 38.4
  B.Cu w10: R1030_4_CH4.1@1219.49,699.8 Q1003_4_CH4.2@1219.49,738.19
NetR43_1: R43.1 U7.8 | length 56.1
  F.Cu w8.39: U7.8@3202.76,2055.12 3202.76,2015.75 R43.1@3214.57,2003.94
NetR44_2: R44.2 U7.29 | length 61.6
  F.Cu w5: U7.29@3320.87,2362.21 3320.87,2384.84 v1(3328.74,2392.72)
  B.Cu w5: R44.2@3320.87,2417.32 3320.87,2400.59 v1(3328.74,2392.72)
NetR63_2: R63.2 U10.4 | length 227.9
  B.Cu w8.39: U10.4@3340.55,635.33 3340.55,598.48 ccw(c3357.32,598.48) 3345.45,586.64 3349.52,582.57 ccw(c3361.36,594.44) 3361.36,577.67 3462.46,577.67 ccw(c3462.46,594.44) 3474.3,582.57 R63.2@3505.91,614.17
NetR72_1: R72.1 U17.2 | length 58.5
  F.Cu w10: R72.1@3719.49,3194.88 3719.49,3212.6 3725.79,3218.9 U17.2@3757.68,3218.9
NetR73_1: R73.1 R95.1 | length 37.4
  B.Cu w10: R73.1@1815.95,509.84 R95.1@1815.95,547.24
NetR74_1: R74.1 R95.2 U11.9 | length 125.4
  B.Cu w10: R74.1@1851.38,584.65 1851.38,547.24 1852.97,548.84 U11.9@1938.73,548.84
NetR87_1: R87.1 U11.1 | length 281.9
  F.Cu w10: v1(1912.1,600.25) 1912.1,471.19 ccw(c1932.1,471.19) 1917.92,457.08 v1(1951.77,423.23)
  B.Cu w10: v1(1912.1,600.25) 1972.23,600.25 1978.09,594.39 U11.1@1978.09,573.46
NetR88_1: R88.1 U11.10 | length 68.4
  B.Cu w10: R88.1@1888.78,584.65 1904.9,568.53 U11.10@1950.55,568.53
NetR93_1: R93.1 R96.2 U13.5 | length 210.4
  F.Cu w10: U13.5@3196.06,3351.77 3202.56,3351.77 3212.99,3341.34 3237.4,3341.34 3249.21,3329.53 3249.21,3244.49 3223.62,3218.9 R96.2@3196.85,3218.9
NetR99_1: R99.1 R102.2 R103.2 U14.3 | length 48.7
  F.Cu w10: R102.2@2216.54,2111.22 2222.44,2105.32 U14.3@2222.44,2064.96
NetR100_1: R100.1 R104.2 R105.2 U15.3 | length 43.3
  F.Cu w10: R104.2@3512.01,3150.59 U15.3@3512.01,3193.9
NetR113_1: R113.1 U18.T10 | length 230.8
  F.Cu w6: U18.T10@3194.94,1328.11 3210.69,1343.86 3210.69,1344.84 3211.59,1344.87 v1(3212.58,1343.88)
  B.Cu w5: v1(3212.58,1343.88) 3211.59,1344.87 3211.59,1345.75 3224.52,1358.68 3252.24,1358.68 3266.79,1344.13 3266.79,1229.2 R113.1@3251.63,1214.04
NetR114_1: R114.1 U18.P10 | length 153.6
  F.Cu w6: U18.P10@3131.95,1328.11 3131.95,1328.21 3147.3,1343.57 3147.3,1344.19 v1@3147.37,1344.26
  B.Cu w5: v1@3147.37,1344.26 3148.09,1343.54 3148.09,1305.32 3132.89,1290.11 3132.89,1276.54 3142.48,1266.95 3162.11,1266.95 R114.1@3178.8,1250.26
  other v1: 3148.34,1344.26
NetR115_2: R115.2 U18.A6 | length 106.7
  F.Cu w5: R115.2@2621.65,1174.41 R115.2@2621.95,1174.7 ; R115.2@2629.92,1167.32 2662.46,1199.86 cw(c2669.5,1192.76) 2669.5,1202.76 U18.A6@2721.95,1202.76
NetR125_2: R125.2 R127.1 U22.3 | length 86.5
  F.Cu w10: U22.3@2326.77,1200.79 2326.77,1240.16 2333.66,1247.05 R125.2@2333.66,1284.45
"NetR132_4_ADC Driver 1_2": "R132_4_ADC Driver 1.2" "R134_4_ADC Driver 1.1" "U12_4_ADC Driver 1.2" | length 86.3
  F.Cu w5: 3031.37,2695.87 3031.37,2732.28 3040.23,2741.14 3040.23,2778.54
"NetR132_4_ADC Driver 2_2": "R132_4_ADC Driver 2.2" "R134_4_ADC Driver 2.1" "U12_4_ADC Driver 2.2" | length 86.3
  F.Cu w5: 2812.86,2695.87 2812.86,2732.28 2821.72,2741.14 2821.72,2778.54
"NetR132_4_ADC Driver 3_2": "R132_4_ADC Driver 3.2" "R134_4_ADC Driver 3.1" "U12_4_ADC Driver 3.2" | length 86.3
  F.Cu w5: 2594.36,2695.87 2594.36,2732.28 2603.21,2741.14 2603.21,2778.54
"NetR132_4_ADC Driver 4_2": "R132_4_ADC Driver 4.2" "R134_4_ADC Driver 4.1" "U12_4_ADC Driver 4.2" | length 86.3
  F.Cu w5: 2375.85,2695.87 2375.85,2732.28 2384.71,2741.14 2384.71,2778.54
"NetR133_4_ADC Driver 1_2": "R133_4_ADC Driver 1.2" "R135_4_ADC Driver 1.1" "U12_4_ADC Driver 1.3" | length 86.3
  F.Cu w5: 3002.83,2778.54 3002.83,2741.14 3011.68,2732.28 3011.68,2695.87
"NetR133_4_ADC Driver 2_2": "R133_4_ADC Driver 2.2" "R135_4_ADC Driver 2.1" "U12_4_ADC Driver 2.3" | length 86.3
  F.Cu w5: 2784.32,2778.54 2784.32,2741.14 2793.18,2732.28 2793.18,2695.87
"NetR133_4_ADC Driver 3_2": "R133_4_ADC Driver 3.2" "R135_4_ADC Driver 3.1" "U12_4_ADC Driver 3.3" | length 86.3
  F.Cu w5: 2565.81,2778.54 2565.81,2741.14 2574.67,2732.28 2574.67,2695.87
"NetR133_4_ADC Driver 4_2": "R133_4_ADC Driver 4.2" "R135_4_ADC Driver 4.1" "U12_4_ADC Driver 4.3" | length 86.3
  F.Cu w5: 2347.31,2778.54 2347.31,2741.14 2356.16,2732.28 2356.16,2695.87
"NetR134_4_ADC Driver 1_2": "R134_4_ADC Driver 1.2" "U12_4_ADC Driver 1.1" | length 55.5
  F.Cu w5: 3051.05,2695.87 3051.05,2716.54 3075.66,2741.14
"NetR134_4_ADC Driver 2_2": "R134_4_ADC Driver 2.2" "U12_4_ADC Driver 2.1" | length 55.5
  F.Cu w5: 2832.55,2695.87 2832.55,2716.54 2857.15,2741.14
"NetR134_4_ADC Driver 3_2": "R134_4_ADC Driver 3.2" "U12_4_ADC Driver 3.1" | length 55.5
  F.Cu w5: 2614.04,2695.87 2614.04,2716.54 2638.65,2741.14
"NetR134_4_ADC Driver 4_2": "R134_4_ADC Driver 4.2" "U12_4_ADC Driver 4.1" | length 55.5
  F.Cu w5: 2395.53,2695.87 2395.53,2716.54 2420.14,2741.14
"NetR135_4_ADC Driver 1_2": "R135_4_ADC Driver 1.2" "U12_4_ADC Driver 1.4" | length 55.5
  F.Cu w5: 2967.39,2741.14 2992,2716.53 2992,2695.87
"NetR135_4_ADC Driver 2_2": "R135_4_ADC Driver 2.2" "U12_4_ADC Driver 2.4" | length 55.5
  F.Cu w5: 2748.89,2741.14 2773.49,2716.53 2773.49,2695.87
"NetR135_4_ADC Driver 3_2": "R135_4_ADC Driver 3.2" "U12_4_ADC Driver 3.4" | length 55.5
  F.Cu w5: 2530.38,2741.14 2554.99,2716.53 2554.99,2695.87
"NetR135_4_ADC Driver 4_2": "R135_4_ADC Driver 4.2" "U12_4_ADC Driver 4.4" | length 55.5
  F.Cu w5: 2311.87,2741.14 2336.48,2716.53 2336.48,2695.87
"NetR136_4_ADC Driver 1_1": "R136_4_ADC Driver 1.1" "U12_4_ADC Driver 1.11" | length 48.9
  F.Cu w5: 3031.37,2581.69 3031.37,2545.28 3040.23,2536.42
"NetR136_4_ADC Driver 2_1": "R136_4_ADC Driver 2.1" "U12_4_ADC Driver 2.11" | length 48.9
  F.Cu w5: 2812.86,2581.69 2812.86,2545.28 2821.72,2536.42
"NetR136_4_ADC Driver 3_1": "R136_4_ADC Driver 3.1" "U12_4_ADC Driver 3.11" | length 48.9
  F.Cu w5: 2594.36,2581.69 2594.36,2545.28 2603.21,2536.42
"NetR136_4_ADC Driver 4_1": "R136_4_ADC Driver 4.1" "U12_4_ADC Driver 4.11" | length 48.9
  F.Cu w5: 2375.85,2581.69 2375.85,2545.28 2384.71,2536.42
"NetR137_4_ADC Driver 1_1": "R137_4_ADC Driver 1.1" "U12_4_ADC Driver 1.10" | length 48.9
  F.Cu w5: 3002.83,2536.42 3011.68,2545.28 3011.68,2581.69
"NetR137_4_ADC Driver 2_1": "R137_4_ADC Driver 2.1" "U12_4_ADC Driver 2.10" | length 48.9
  F.Cu w5: 2784.32,2536.42 2793.18,2545.28 2793.18,2581.69
"NetR137_4_ADC Driver 3_1": "R137_4_ADC Driver 3.1" "U12_4_ADC Driver 3.10" | length 48.9
  F.Cu w5: 2565.81,2536.42 2574.67,2545.28 2574.67,2581.69
"NetR137_4_ADC Driver 4_1": "R137_4_ADC Driver 4.1" "U12_4_ADC Driver 4.10" | length 48.9
  F.Cu w5: 2347.31,2536.42 2356.16,2545.28 2356.16,2581.69
OPA_OUT_CH1: C1035_4_CH1.1 R1043_4_CH1.2 U1001_4_CH1.4 U1011_4_CH1.1 | length 584.1
  F.Cu w6: R1043_4_CH1.2@1433.07,3222.44 1437.99,3217.52 1437.99,3203.74 1459.65,3182.09 1459.65,3157.48 1485.24,3131.89 1537.4,3131.89 v1(1558.07,3152.56) ; U1001_4_CH1.4@1558.07,3187.01 v1(1558.07,3152.56) ; C1035_4_CH1.1@1660.43,3140.16 1656.1,3135.83 1574.8,3135.83 v1(1558.07,3152.56)
  B.Cu w5: v1(1511.81,2946.36) 1542.61,2946.36 ccw(c1542.61,2956.36) 1549.66,2949.27 1555.16,2954.76 ccw(c1548.07,2961.82) 1558.07,2961.82 v1(1558.07,3152.56)
OPA_OUT_CH2: C1035_4_CH2.1 R1043_4_CH2.2 U1001_4_CH2.4 U1011_4_CH2.1 | length 584.9
  F.Cu w6: R1043_4_CH2.2@1433.07,2415.35 1437.99,2410.43 1437.99,2396.65 1459.65,2375 1459.65,2350.39 1485.24,2324.8 1537.4,2324.8 v1(1558.07,2345.47) ; U1001_4_CH2.4@1558.07,2379.92 v1(1558.07,2345.47) ; C1035_4_CH2.1@1660.43,2333.07 1656.1,2328.74 1574.8,2328.74 v1(1558.07,2345.47)
  B.Cu w5: v1(1511.81,2139.27) 1546.75,2139.27 1558.07,2150.59 v1(1558.07,2345.47)
OPA_OUT_CH3: C1035_4_CH3.1 R1043_4_CH3.2 U1001_4_CH3.4 U1011_4_CH3.1 | length 584.9
  F.Cu w6: R1043_4_CH3.2@1433.07,1608.27 1437.99,1603.35 1437.99,1589.57 1459.65,1567.91 1459.65,1543.31 1485.24,1517.72 1537.4,1517.72 v1(1558.07,1538.39) ; U1001_4_CH3.4@1558.07,1572.83 v1(1558.07,1538.39) ; C1035_4_CH3.1@1660.43,1525.98 1656.1,1521.65 1574.8,1521.65 v1(1558.07,1538.39)
  B.Cu w5: v1(1511.81,1332.19) 1546.75,1332.19 1558.07,1343.5 v1(1558.07,1538.39)
OPA_OUT_CH4: C1035_4_CH4.1 R1043_4_CH4.2 U1001_4_CH4.4 U1011_4_CH4.1 | length 585.3
  F.Cu w6: R1043_4_CH4.2@1433.07,801.18 1437.99,796.26 1437.99,782.48 1459.65,760.83 1459.65,736.22 1485.24,710.63 1537.4,710.63 v1(1558.07,731.3) ; U1011_4_CH4.1@1511.81,525.1 1542.81,525.1 1543.31,524.61 v1(1546.26,524.61) ; U1001_4_CH4.4@1558.07,765.75 v1(1558.07,731.3) ; C1035_4_CH4.1@1660.43,718.9 1656.1,714.57 1574.8,714.57 v1(1558.07,731.3)
  B.Cu w5: v1(1546.26,524.61) 1558.07,536.42 v1(1558.07,731.3)
OUT_R_CH1_N: J3_4_CH1.1 R97_4_CH1.1 U1008_4_CH1.14 | length 60.5
  F.Cu w5: U1008_4_CH1.14@1943.05,3296.26 1943.98,3295.33 1988.13,3295.33 v1(1996.06,3287.4)
  B.Cu w5: J3_4_CH1.1@1994.09,3284.45 1996.06,3286.42 v1(1996.06,3287.4)
OUT_R_CH1_P: J4_4_CH1.1 R52_4_CH1.1 U1008_4_CH1.15 | length 63.6
  F.Cu w5: U1008_4_CH1.15@1940.94,3315.94 1941.87,3316.87 1988.13,3316.87 v1(1996.06,3324.8) R52_4_CH1.1@1996.06,3322.84
  B.Cu w5: J4_4_CH1.1@1993.33,3324.46 1995.72,3324.46 v1(1996.06,3324.8)
OUT_R_CH2_N: J3_4_CH2.1 R97_4_CH2.1 U1008_4_CH2.14 | length 60.5
  F.Cu w5: U1008_4_CH2.14@1943.05,2489.17 1943.98,2488.25 1988.13,2488.25 v1(1996.06,2480.32)
  B.Cu w5: J3_4_CH2.1@1994.09,2477.36 1996.06,2479.33 v1(1996.06,2480.32)
OUT_R_CH2_P: J4_4_CH2.1 R52_4_CH2.1 U1008_4_CH2.15 | length 63.6
  F.Cu w5: U1008_4_CH2.15@1940.94,2508.86 1941.87,2509.78 1988.13,2509.78 v1(1996.06,2517.72) R52_4_CH2.1@1996.06,2515.75
  B.Cu w5: J4_4_CH2.1@1993.33,2517.37 1995.72,2517.37 v1(1996.06,2517.72)
OUT_R_CH3_N: J3_4_CH3.1 R97_4_CH3.1 U1008_4_CH3.14 | length 60.5
  F.Cu w5: U1008_4_CH3.14@1943.05,1682.09 1943.98,1681.16 1988.13,1681.16 v1(1996.06,1673.23)
  B.Cu w5: J3_4_CH3.1@1994.09,1670.28 1996.06,1672.24 v1(1996.06,1673.23)
OUT_R_CH3_P: J4_4_CH3.1 R52_4_CH3.1 U1008_4_CH3.15 | length 63.6
  F.Cu w5: U1008_4_CH3.15@1940.94,1701.77 1941.87,1702.7 1988.13,1702.7 v1(1996.06,1710.63) R52_4_CH3.1@1996.06,1708.66
  B.Cu w5: J4_4_CH3.1@1993.33,1710.29 1995.72,1710.29 v1(1996.06,1710.63)
OUT_R_CH4_N: J3_4_CH4.1 R97_4_CH4.1 U1008_4_CH4.14 | length 60.5
  F.Cu w5: U1008_4_CH4.14@1943.05,875 1943.98,874.07 1988.13,874.07 v1(1996.06,866.14)
  B.Cu w5: J3_4_CH4.1@1994.09,863.19 1996.06,865.16 v1(1996.06,866.14)
OUT_R_CH4_P: J4_4_CH4.1 R52_4_CH4.1 U1008_4_CH4.15 | length 63.6
  F.Cu w5: U1008_4_CH4.15@1940.94,894.69 1941.87,895.61 1988.13,895.61 v1(1996.06,903.54) R52_4_CH4.1@1996.06,901.58
  B.Cu w5: J4_4_CH4.1@1993.33,903.2 1995.72,903.2 v1(1996.06,903.54)
PCIe_PER0_N: C40.1 P1.A17 | length 937.6
  B.Cu w6.2: P1.A17@2505.91,-39.37 2495.23,-28.69 2495.23,44.57 2492.32,47.47 2492.32,297.66 2583.86,389.19 2583.86,835.4 C40.1@2597.44,849.02
PCIe_PER0_P: C41.1 P1.A16 | length 937.6
  B.Cu w6.2: P1.A16@2466.54,-39.37 2477.22,-28.69 2477.22,44.57 2480.12,47.47 2480.12,302.71 2571.66,394.25 2571.66,835.4 C41.1@2558.07,849.02
PCIe_PER1_N: C36.1 P1.A22 | length 910.6
  B.Cu w6.2: C36.1@2676.18,849.02 2662.6,835.4 2662.6,332.28 2689.17,305.7 2689.17,47.47 2692.08,44.57 2692.08,-28.69 P1.A22@2702.76,-39.37
PCIe_PER1_P: C37.1 P1.A21 | length 910.6
  B.Cu w6.2: C37.1@2636.81,849.02 2650.4,835.4 2650.4,327.22 2676.97,300.65 2676.97,47.47 2674.07,44.57 2674.07,-28.69 P1.A21@2663.39,-39.37
PCIe_PER2_N: C32.1 P1.A26 | length 943.3
  B.Cu w6.2: C32.1@2754.92,849.02 2741.34,835.4 2741.34,783.84 2741.34,398.44 2846.65,293.13 2846.65,47.47 2849.56,44.57 2849.56,-28.69 P1.A26@2860.24,-39.37
PCIe_PER2_P: C33.1 P1.A25 | length 943.3
  B.Cu w6.2: C33.1@2715.55,849.02 2729.14,835.4 2729.14,788.89 2729.14,393.39 2834.45,288.08 2834.45,47.47 2831.55,44.57 2831.55,-28.69 P1.A25@2820.87,-39.37
PCIe_PER3_N: C28.1 P1.A30 | length 980.9
  B.Cu w6.2: C28.1@2833.66,849.02 2820.08,835.4 2820.08,463.17 3004.13,279.11 3004.13,77.03 3004.13,47.47 3007.04,44.57 3007.04,-33.74 P1.A30@3017.72,-44.42
PCIe_PER3_P: C29.1 P1.A29 | length 975.9
  B.Cu w6.2: C29.1@2794.29,849.02 2807.88,835.4 2807.88,458.11 2991.93,274.06 2991.93,71.98 2991.93,47.47 2989.03,44.57 2989.03,-28.69 P1.A29@2978.35,-39.37
PCIe_PERST#: P1.A11 R23.2 | length 1897.7
  F.Cu w10: v1(3074.8,208.66) 3074.8,273.35 cw(c3094.8,273.35) 3080.63,287.46 3194.06,400.89 ccw(c3179.89,415) 3199.89,415 3199.89,480.5 ccw(c3179.89,480.5) 3194.09,494.59 3175.12,513.55 cw(c3189.29,527.67) 3169.29,527.67 3169.29,817.5 cw(c3189.29,817.5) 3175.12,831.61 R23.2@3191.93,848.42
  In3.Cu (Sign) w10: v1(2236.22,259.84) cw(c2242.73,240.93) 2242.73,260.93 3037.24,260.93 cw(c3037.24,240.93) 3051.35,255.1 3068.98,237.48 cw(c3054.8,223.37) 3074.8,223.37 v1(3074.8,208.66)
  B.Cu w10: P1.A11@2190.94,-39.37 2190.94,161.97 cw(c2210.95,161.97) 2196.77,176.08 2230.39,209.71 ccw(c2216.22,223.82) 2236.22,223.82 v1(2236.22,259.84)
PCIe_PET0_N: P1.B15 R37.2 | length 1099.1
  F.Cu w6.2: P1.B15@2427.17,-39.37 2416.49,-28.69 2416.49,44.57 2413.58,47.47 2413.58,236.33 2897.66,720.4 2897.66,836 R37.2@2910.08,848.42
PCIe_PET0_P: P1.B14 R38.2 | length 1099.1
  F.Cu w6.2: P1.B14@2387.8,-39.37 2398.47,-28.69 2398.47,44.57 2401.38,47.47 2401.38,241.38 2885.46,725.46 2885.46,836 R38.2@2873.03,848.42
PCIe_PET1_N: P1.B20 R33.2 | length 1020.7
  F.Cu w6.2: P1.B20@2624.02,-4.92 2613.34,5.76 2613.34,44.57 2610.43,47.47 2610.43,256.15 2988.38,634.1 2988.38,835.82 R33.2@3000.98,848.42
PCIe_PET1_P: P1.B19 R34.2 | length 1015.7
  F.Cu w6.2: P1.B19@2584.65,0.13 2595.33,10.81 2595.33,44.57 2598.23,47.47 2598.23,261.2 2976.18,639.16 2976.18,835.82 R34.2@2963.58,848.42
PCIe_PET2_N: P1.B24 R29.2 | length 1020.8
  F.Cu w6.2: P1.B24@2781.5,-39.37 2770.82,-28.69 2770.82,44.57 2767.91,47.47 2767.91,293.54 3062.84,588.47 3062.84,835.82 R29.2@3075.44,848.42
PCIe_PET2_P: P1.B23 R30.2 | length 1020.8
  F.Cu w6.2: P1.B23@2742.13,-39.37 2752.81,-28.69 2752.81,44.57 2755.71,47.47 2755.71,298.59 3050.64,593.52 3050.64,835.82 R30.2@3038.04,848.42
PCIe_PET3_N: P1.B28 R25.2 | length 952.3
  F.Cu w6.2: P1.B28@2938.98,-4.92 2928.3,5.76 2928.3,44.57 2925.39,47.47 2925.39,317.92 3137.81,530.34 3137.81,835.65 R25.2@3150.59,848.42
PCIe_PET3_P: P1.B27 R26.2 | length 947.2
  F.Cu w6.2: P1.B27@2899.61,0.13 2910.29,10.81 2910.29,44.57 2913.19,47.47 2913.19,322.97 3125.61,535.39 3125.61,835.65 R26.2@3112.84,848.42
PCIe_REFCLK_N: C44.1 P1.A14 | length 953.9
  B.Cu w6.2: P1.A14@2387.8,-39.37 2377.12,-28.69 2377.12,44.57 2374.21,47.47 2374.21,348.84 2505.12,479.74 2505.12,735.2 2505.12,835.4 C44.1@2518.7,849.02
PCIe_REFCLK_P: C45.1 P1.A13 | length 953.9
  B.Cu w6.2: P1.A13@2348.43,-39.37 2359.1,-28.69 2359.1,44.57 2362.01,47.47 2362.01,353.89 2492.92,484.8 2492.92,740.25 2492.92,835.4 C45.1@2479.33,849.02
PERST#: R23.1 R24.1 TP13.1 U18.U9 | length 556.2
  F.Cu w6: R23.1@3191.93,883.86 3183.12,883.86 v1(3191.93,885.83) 3193.9,885.83 3200.74,892.67 3287.9,979.83 ccw(c3279.39,988.29) 3291.39,988.29 3291.39,1255.13 ccw(c3279.39,1255.13) 3287.88,1263.62 3274.04,1277.45 ccw(c3265.56,1268.97) 3265.56,1280.97 3247.05,1280.97 cw(c3247.05,1292.97) 3238.59,1284.46 U18.U9@3226.43,1296.62
  B.Cu w6: v1(3191.93,885.83) 3192.42,886.32 3192.42,928.64 TP13.1@3192.91,929.13
PG_1V0: R121.1 TP79.1 U20.6 U21.4 | length 2027
  F.Cu w10: v1(2186.22,1483.07) 2196.85,1472.44 U21.4@2217.91,1472.44 ; v1(3372.05,1166.34) U20.6@3396.06,1166.34
  In3.Cu (Sign) w5: v1(2186.22,1483.07) 2146.61,1443.46 ccw(c2153.7,1436.41) 2143.7,1436.41 2143.7,1158.67 ccw(c2153.7,1158.67) 2146.62,1151.61 2306.07,992.16 cw(c2299,985.09) 2309,985.09 v1(2309,903)
  B.Cu w5: v1(2309,903) 2390.18,903 ccw(c2390.18,913) 2397.23,905.91 2431.34,940.01 cw(c2438.38,932.91) 2438.38,942.91 2950.58,942.91 ccw(c2950.58,952.91) 2957.64,945.83 2978.4,966.59 cw(c2985.44,959.49) 2985.44,969.49 3278.59,969.49 ccw(c3278.59,979.49) 3285.64,972.4 3325.83,1012.58 ccw(c3318.74,1019.64) 3328.74,1019.64 3328.74,1147.43 cw(c3338.74,1147.43) 3331.65,1154.49 3340.61,1163.44 cw(c3347.65,1156.34) 3347.65,1166.34 v1(3372.05,1166.34)
  B.Cu w6: v1(2186.22,1483.07) 2186.22,1485.43 R121.1@2222.44,1521.65
PG_1V8: R1.1 R128.1 TP80.1 U8.4 U21.6 U22.7 U23.4 | length 3197
  F.Cu w10: v1(2204.72,1433.07) U21.6@2217.91,1433.07 ; v1(2307.09,1087.8) U22.7@2307.09,1110.24 ; U23.4@2389.37,1629.92 v1(2421.65,1629.92) ; U8.4@3568.5,1366.58 3576.33,1366.58 v1@3588.58,1354.33
  In3.Cu (Sign) w5: v1(2204.72,1433.07) 2204.72,1350.6 ccw(c2214.72,1350.6) 2207.61,1343.57 2241.17,1310.02 cw(c2234.09,1302.94) 2244.09,1302.94 2244.09,1153.55 ccw(c2254.09,1153.55) 2246.98,1146.53 2303.4,1090.11 ccw(c2310.43,1097.22) v1(2307.09,1087.8) ; v1(2307.09,1087.8) 2338.09,1056.79 cw(c2331,1049.74) 2341,1049.74 v1(2341,752)
  In3.Cu (Sign) w6: v1(2204.72,1433.07) 2204.72,1486.33 cw(c2216.72,1486.33) 2208.22,1494.79 2309.36,1595.93 cw(c2317.8,1587.41) 2317.8,1599.41 2386.17,1599.41 ccw(c2386.17,1611.41) 2394.63,1602.9 v1(2421.65,1629.92)
  B.Cu w5: v1(2341,752) 2341,819.14 cw(c2351,819.14) 2343.91,826.2 2446.9,929.19 cw(c2453.95,922.09) 2453.95,932.09 2953.9,932.09 ccw(c2953.9,942.09) 2960.95,935 2981.72,955.76 cw(c2988.76,948.66) 2988.76,958.66 3319.06,958.66 cw(c3319.06,948.66) 3326.12,955.75 3360.47,921.4 ccw(c3367.53,928.48) 3367.53,918.48 3627.17,918.48 ccw(c3627.17,928.48) 3634.22,921.39 3641.77,928.94 ccw(c3634.68,936) 3644.68,936 3644.68,1107.08 ccw(c3634.68,1107.08) 3641.79,1114.12 3566.89,1189.02 cw(c3573.98,1196.07) 3563.98,1196.07 R1.1@3563.98,1315.4
  B.Cu w6: R128.1@2384.84,1580.71 2418.16,1614.03 ccw(c2409.65,1622.49) 2421.65,1622.49 v1(2421.65,1629.92) ; R1.1@3563.98,1315.4 3585.09,1336.52 ccw(c3576.58,1344.98) 3588.58,1344.98 v1@3588.58,1354.33
  B.Cu w10: TP80.1@2384.84,1522.64 R128.1@2384.84,1580.71
  other v1: 3588.58,1352.36
PGA_BIAS_CH1: C1042_4_CH1.2 FB1001_4_CH1.2 R1045_4_CH1.2 R1046_4_CH1.2 TP1017_4_CH1.1 U1008_4_CH1.7 | length 232.2
  F.Cu w9.84: v1@1762.23,3296.26 v1(1762.8,3296.26) U1008_4_CH1.7@1789.37,3296.26
  B.Cu w10: R1045_4_CH1.2@1714.07,3364.67 R1045_4_CH1.2@1714.57,3365.16 ; R1046_4_CH1.2@1751.97,3365.16 R1045_4_CH1.2@1714.57,3365.16 ; TP1017_4_CH1.1@1796.26,3286.42 1772.64,3286.42 v1(1762.8,3296.26) 1761.65,3297.41 1761.65,3300.06 1742.14,3319.57 1740.87,3319.57 C1042_4_CH1.2@1733.27,3327.17 1732.68,3327.76 FB1001_4_CH1.2@1694.88,3327.76 ; FB1001_4_CH1.2@1694.88,3327.76 1694.88,3345.47 R1045_4_CH1.2@1714.57,3365.16 ; FB1001_4_CH1.2@1694.88,3327.76 1695.37,3328.25 FB1001_4_CH1.2@1694.88,3327.76
PGA_BIAS_CH2: C1042_4_CH2.2 FB1001_4_CH2.2 R1045_4_CH2.2 R1046_4_CH2.2 TP1017_4_CH2.1 U1008_4_CH2.7 | length 232.8
  F.Cu w9.84: v1@1762.23,2489.17 v1(1762.8,2489.17) U1008_4_CH2.7@1789.37,2489.17
  B.Cu w10: FB1001_4_CH2.2@1694.88,2520.67 1695.37,2521.16 FB1001_4_CH2.2@1694.88,2520.67 ; R1045_4_CH2.2@1714.07,2557.58 R1045_4_CH2.2@1714.57,2558.07 ; R1046_4_CH2.2@1751.97,2558.07 R1045_4_CH2.2@1714.57,2558.07 ; TP1017_4_CH2.1@1796.26,2479.33 1772.64,2479.33 1761.65,2490.32 1761.65,2493.9 1743.07,2512.48 1740.87,2512.48 C1042_4_CH2.2@1733.27,2520.08 1732.68,2520.67 FB1001_4_CH2.2@1694.88,2520.67 ; FB1001_4_CH2.2@1694.88,2520.67 1694.88,2538.39 R1045_4_CH2.2@1714.57,2558.07
PGA_BIAS_CH3: C1042_4_CH3.2 FB1001_4_CH3.2 R1045_4_CH3.2 R1046_4_CH3.2 TP1017_4_CH3.1 U1008_4_CH3.7 | length 232.9
  F.Cu w9.84: v1@1762.23,1682.09 v1(1762.8,1682.09) U1008_4_CH3.7@1789.37,1682.09
  B.Cu w10: R1045_4_CH3.2@1714.07,1750.49 R1045_4_CH3.2@1714.57,1750.98 ; R1046_4_CH3.2@1751.97,1750.98 R1045_4_CH3.2@1714.57,1750.98 ; TP1017_4_CH3.1@1796.26,1672.24 1772.64,1672.24 v1(1762.8,1682.09) 1761.65,1683.23 1761.65,1687.09 1743.34,1705.39 1740.87,1705.39 C1042_4_CH3.2@1733.27,1712.99 1732.68,1713.58 FB1001_4_CH3.2@1694.88,1713.58 ; FB1001_4_CH3.2@1694.88,1713.58 1695.37,1714.08 FB1001_4_CH3.2@1694.88,1713.58 ; FB1001_4_CH3.2@1694.88,1713.58 1694.88,1731.3 R1045_4_CH3.2@1714.57,1750.98
PGA_BIAS_CH4: C1042_4_CH4.2 FB1001_4_CH4.2 R1045_4_CH4.2 R1046_4_CH4.2 TP1017_4_CH4.1 U1008_4_CH4.7 | length 231.4
  F.Cu w9.84: v1@1762.23,875 v1(1762.8,875) U1008_4_CH4.7@1789.37,875
  B.Cu w10: R1045_4_CH4.2@1714.07,943.41 R1045_4_CH4.2@1714.57,943.9 ; C1042_4_CH4.2@1732.68,906.5 FB1001_4_CH4.2@1694.88,906.5 ; C1042_4_CH4.2@1733.27,905.91 1740.87,898.31 1742.14,898.31 1748.16,892.28 1761.65,878.8 1761.65,876.15 v1(1762.8,875) 1772.64,865.16 TP1017_4_CH4.1@1796.26,865.16 ; R1046_4_CH4.2@1751.97,943.9 R1045_4_CH4.2@1714.57,943.9 ; FB1001_4_CH4.2@1694.88,906.5 1695.37,906.99 FB1001_4_CH4.2@1694.88,906.5 ; FB1001_4_CH4.2@1694.88,906.5 1694.88,924.21 R1045_4_CH4.2@1714.57,943.9